# Altium PCB Layout.PcbDoc
Units mm, origin at the board's own origin, x right, y up, seen from the top; angles counter-clockwise.
Board outline 42 x 50 mm, 4 copper layers (Top Layer, Ground Layer, Power Layer, Bottom Layer), stack 1.591 mm thick; 42 components, 51 nets, 169 pads, 78 vias.
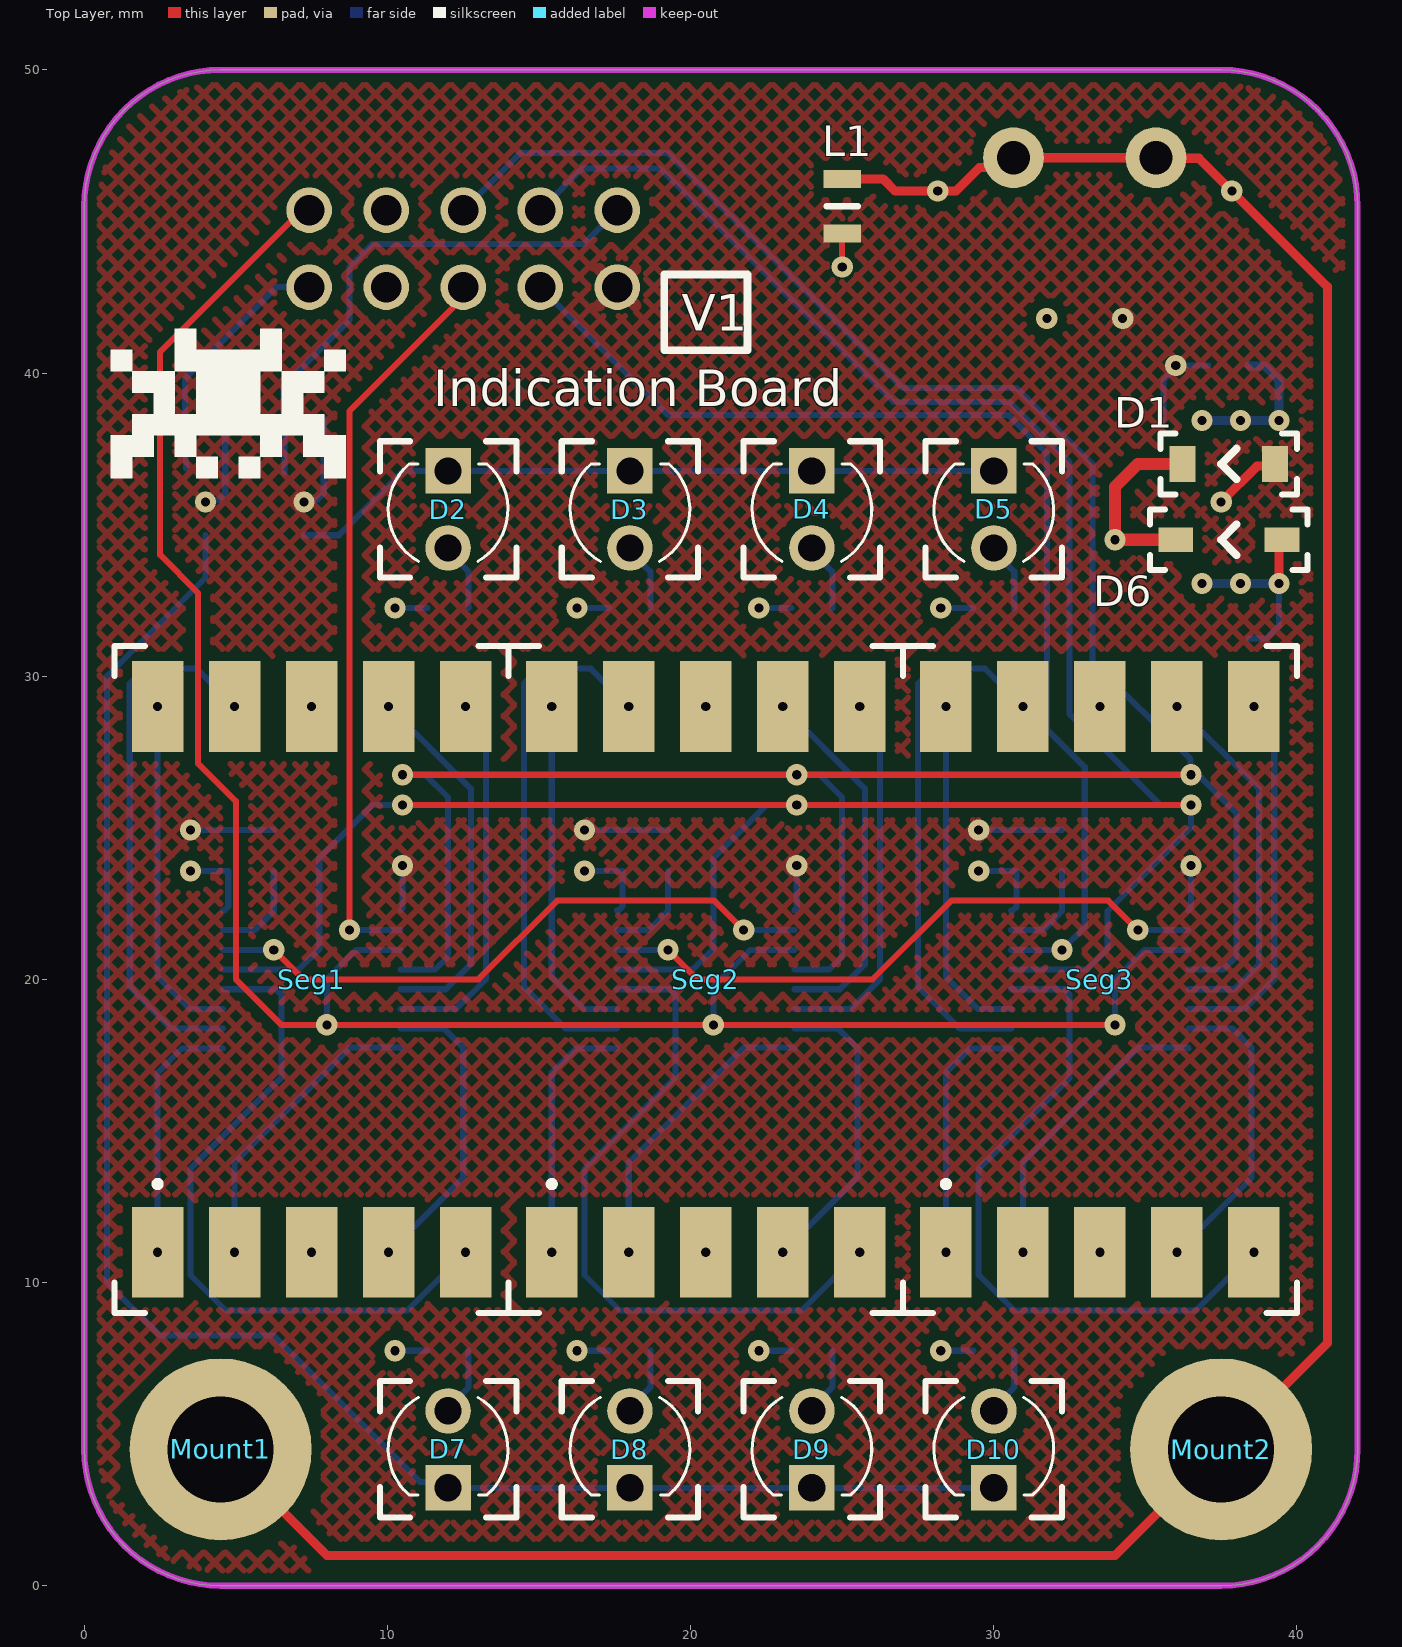
[diagram p0: Top Layer view]
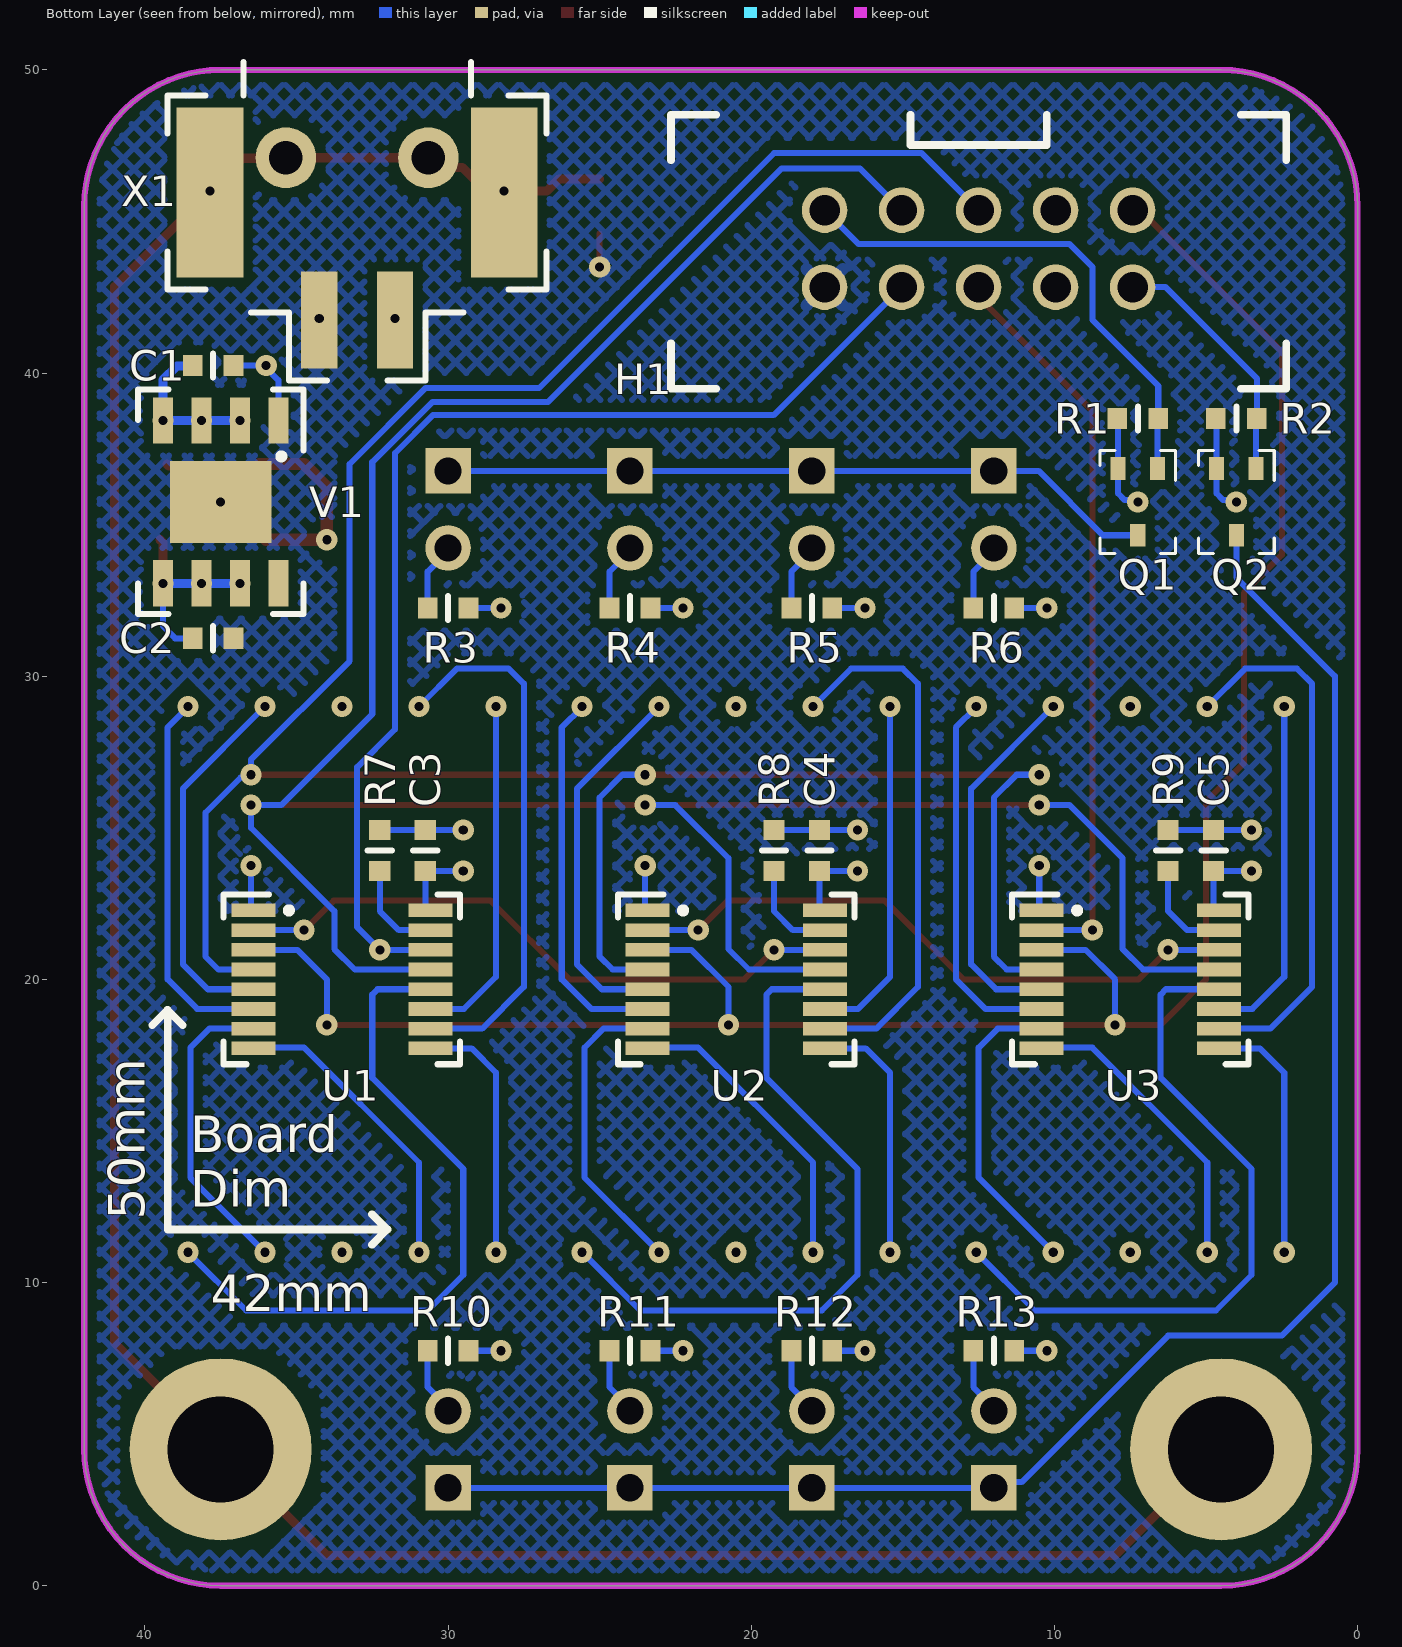
[diagram p1: Bottom Layer view, seen from below]
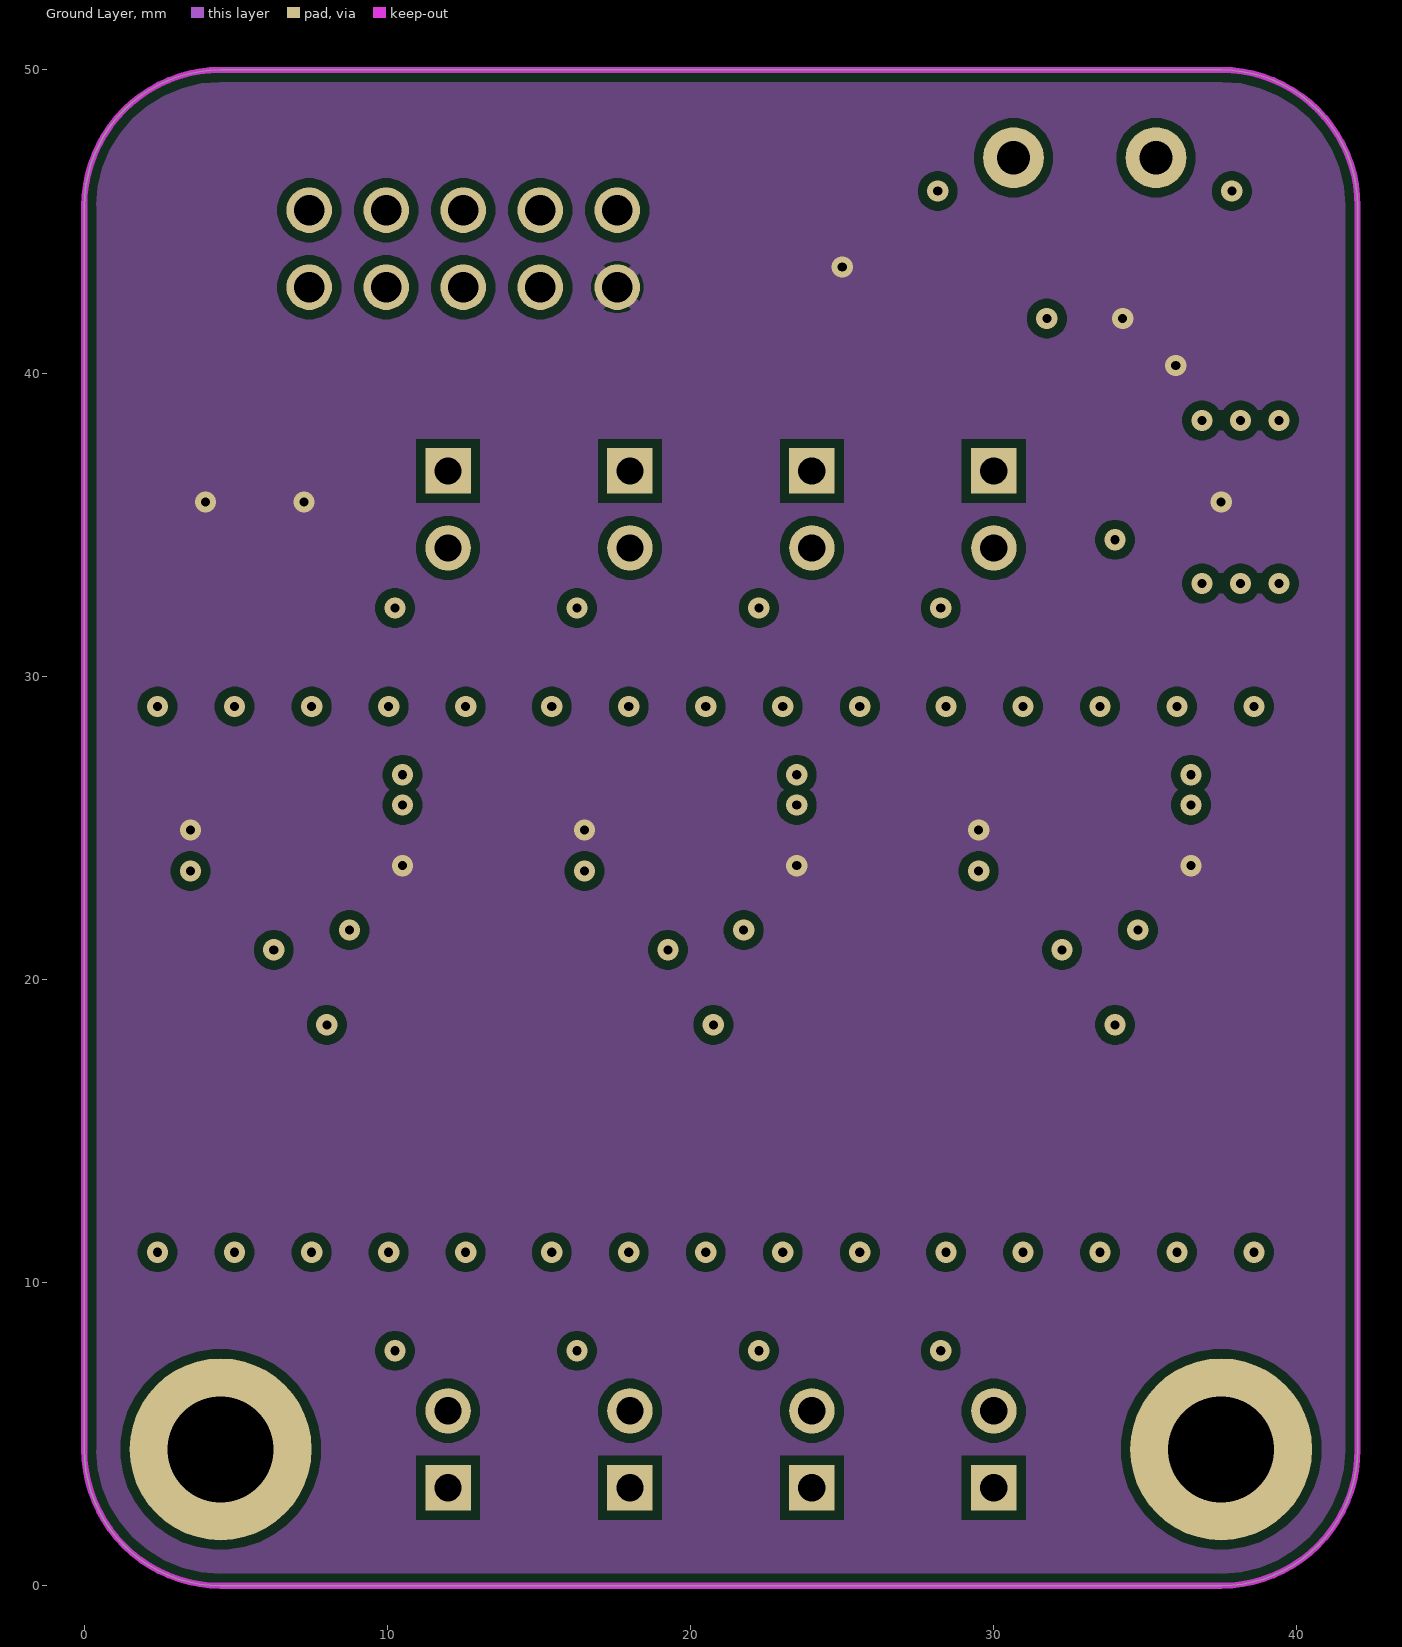
[diagram p2: Ground Layer]
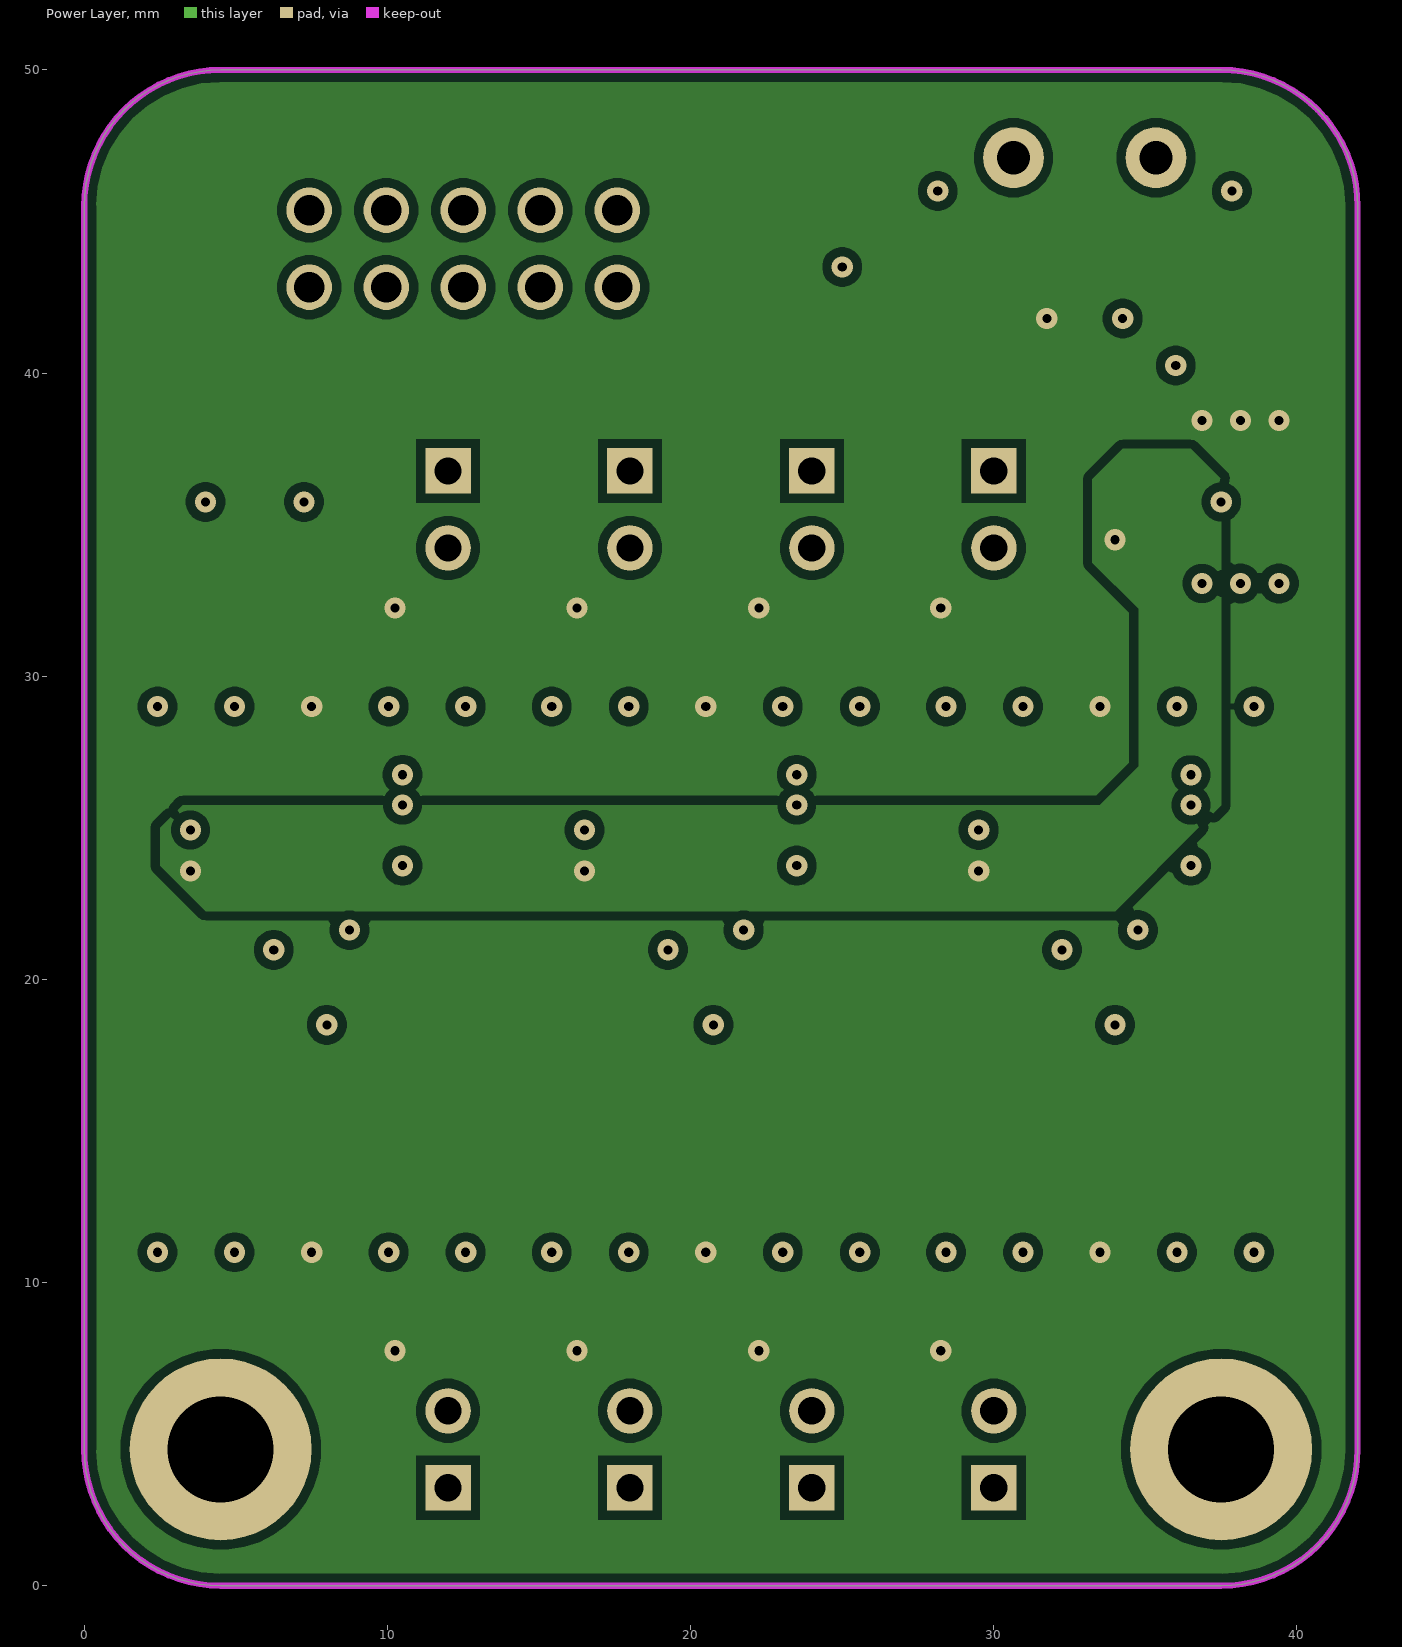
[diagram p3: Power Layer]
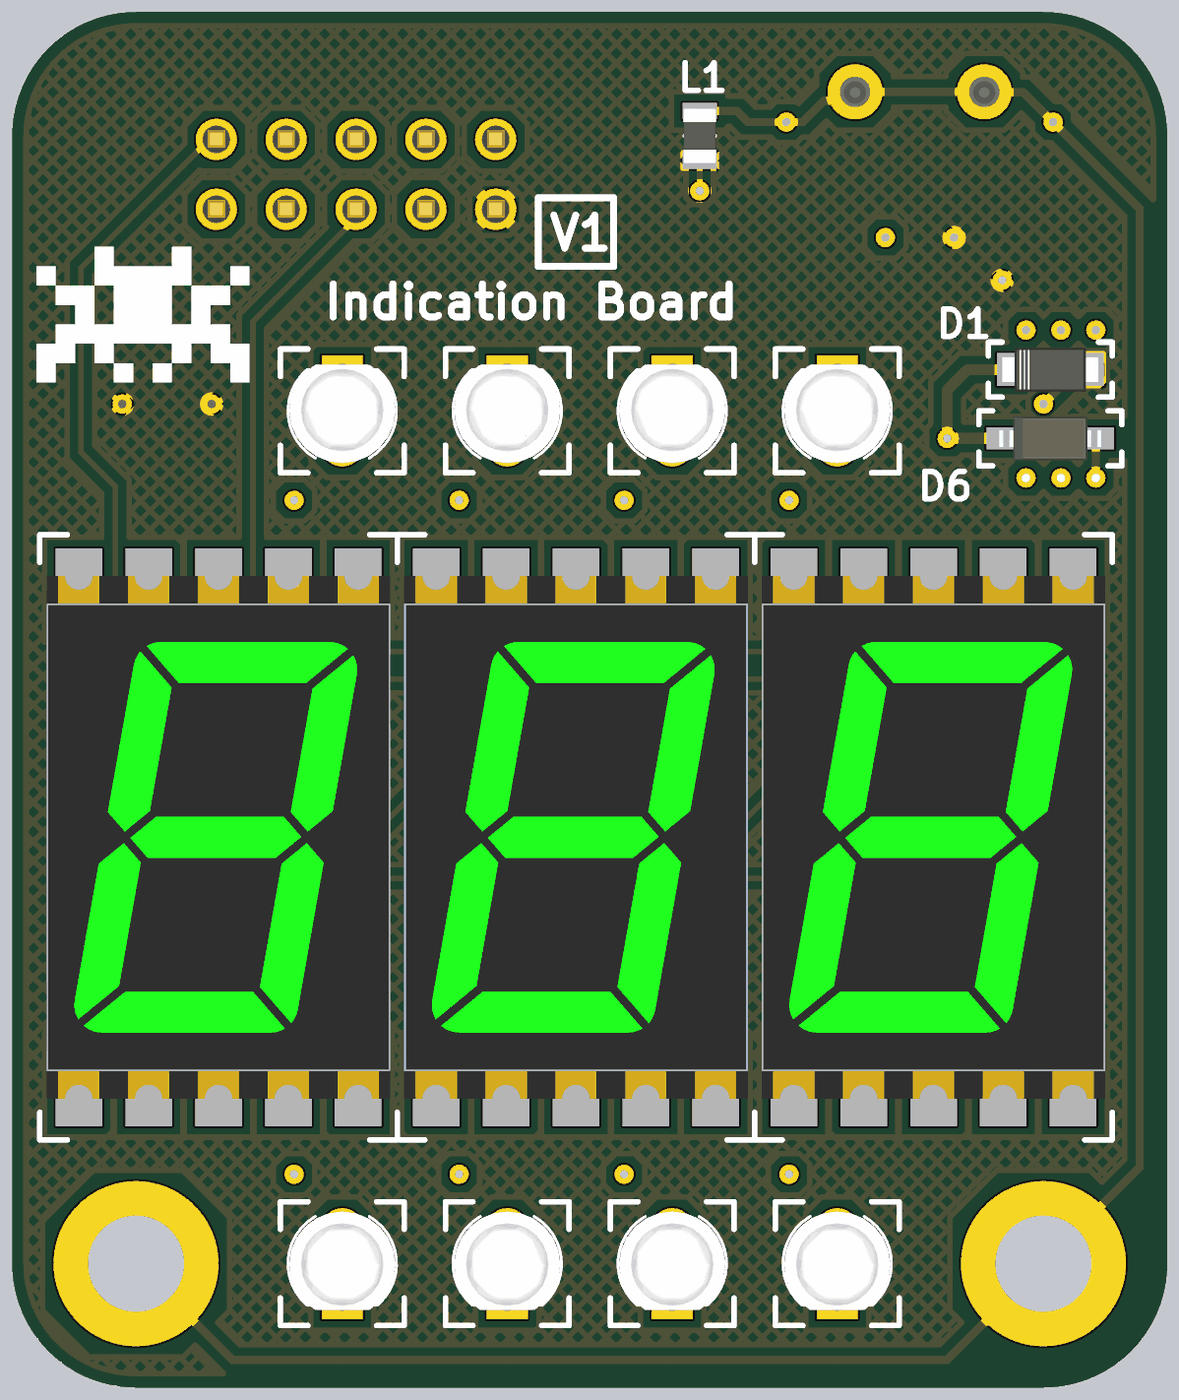
[diagram p4: 3D render of the assembled board from above, using the file's embedded part models]
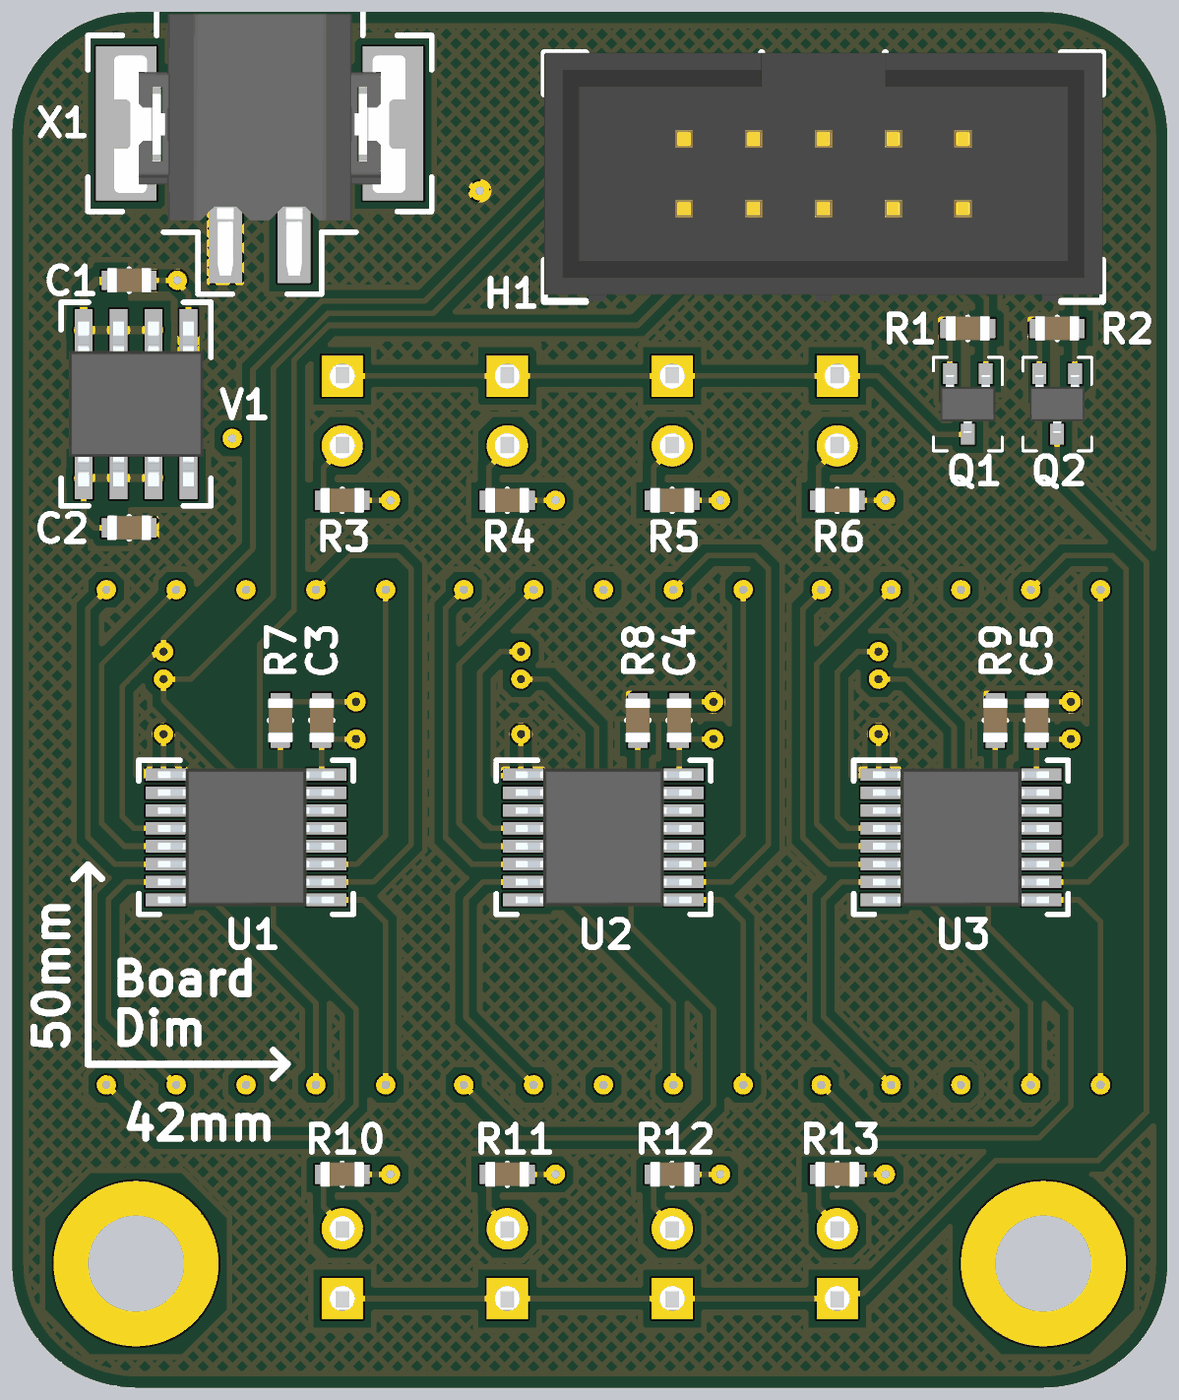
[diagram p5: 3D render of the assembled board from below, using the file's embedded part models]

## Layer stack, top to bottom
Top Solder: solder mask 0.0102, Solder Resist, Dk 3.8
Top Layer: signal copper 0.035
Dielectric 2: prepreg 0.2104, 7628*1, Dk 4.4
Ground Layer: signal copper 0.0175
Dielectric 1: dielectric 1.065, FR-4, Dk 4.8
Power Layer: signal copper 0.0175
Dielectric 3: prepreg 0.2104, 7628*1, Dk 4.4
Bottom Layer: signal copper 0.035
Bottom Solder: solder mask 0.0102, Solder Resist, Dk 3.8

## Board outline
4.5,0 cw(c4.5,4.5) 0,4.5 0,45.5 cw(c4.5,45.5) 4.5,50 37.5,50 cw(c37.5,45.5) 42,45.5 42,4.5 cw(c37.5,4.5) 37.5,0

## Design rules (kind name [scope] priority, off if disabled: settings)
BoardOutlineClearance [All] p1: gap=0.2 ignorepadtopadclearanceinfootprint=FALSE
Clearance "inPolygon Clearance" [InPolygon] p1: gap=0.3 ignorepadtopadclearanceinfootprint=TRUE // this rule ensures that every net within a polygon of a different net has a set clearance from the poly
Clearance "High Current Polygon Clearance" [(InPolygon AND InNetClass('High_Current_Nets'))] p2: gap=0 ignorepadtopadclearanceinfootprint=TRUE // this rule ensures that every net within a polygon of a different net has a set clearance from the poly
Clearance "Different Diff Pair" [All] p3: gap=0.2 ignorepadtopadclearanceinfootprint=TRUE
Clearance "Same Diff Pair" [All] p4: gap=0.1 ignorepadtopadclearanceinfootprint=TRUE
Clearance "Different Nets" [not InAnyDifferentialPair] p5: gap=0.3 ignorepadtopadclearanceinfootprint=TRUE except(0.1: Arc-SMDPad Arc-THPad Arc-Via Arc-Text Track-SMDPad Track-THPad Track-Via Track-Text SMDPad-Text THPad-Text Via-Text Fill-Text Poly-Text Region-Text Text-Text; 0.12: Arc-Arc Arc-Track Track-Track; 0.15: SMDPad-SMDPad SMDPad-THPad SMDPad-Via THPad-THPad THPad-Via Via-Via; 0.2: Arc-Hole Track-Hole SMDPad-Hole THPad-Hole Via-Hole Fill-Hole Poly-Hole Region-Hole Text-Hole)
Clearance "Same Net" [not InAnyDifferentialPair] p6: gap=0 ignorepadtopadclearanceinfootprint=TRUE except(0.1: THPad-Via; 0.18: Arc-Arc Arc-Track Track-Track)
ComponentClearance [All] p1: gap=0.102 collisioncheckmode=3 verticalgap=0.102 showdistances=TRUE
DiffPairsRouting "Ethernet Routing" [InDifferentialPairClass('Ethernet_Pairs')] p1: maxlimit=0.25 minlimit=0.2 mostfreqgap=0.25 toplayer_maxgap=0.2 toplayer_prefgap=0.2 toplayer_minwidth=0.25 toplayer_maxwidth=0.25 toplayer_prefwidth=0.25 midlayer1_mingap=0.25 midlayer1_minwidth=0.19 midlayer1_maxwidth=0.19 midlayer1_prefwidth=0.19 midlayer2_mingap=0.25 midlayer2_minwidth=0.19 midlayer2_maxwidth=0.19 midlayer2_prefwidth=0.19 bottomlayer_maxgap=0.2 bottomlayer_prefgap=0.2 bottomlayer_minwidth=0.25 bottomlayer_maxwidth=0.25 bottomlayer_prefwidth=0.25 impedanceprofiledriven=TRUE maxuncoupledlength=12.7
DiffPairsRouting "USB Routing" [InDifferentialPairClass('USB_Pairs')] p2: maxlimit=0.291 minlimit=0.127 mostfreqgap=0.291 toplayer_maxgap=0.127 toplayer_prefgap=0.127 toplayer_minwidth=0.23 toplayer_maxwidth=0.23 toplayer_prefwidth=0.23 midlayer1_mingap=0.291 midlayer1_minwidth=0.25 midlayer1_maxwidth=0.25 midlayer1_prefwidth=0.25 midlayer2_mingap=0.291 midlayer2_minwidth=0.25 midlayer2_maxwidth=0.25 midlayer2_prefwidth=0.25 bottomlayer_maxgap=0.127 bottomlayer_prefgap=0.127 bottomlayer_minwidth=0.23 bottomlayer_maxwidth=0.23 bottomlayer_prefwidth=0.23 maxuncoupledlength=12.7
DiffPairsRouting "CAN Routing" [InDifferentialPairClass('CAN_Pairs')] p3: maxlimit=0.907 minlimit=0.5 mostfreqgap=0.907 toplayer_maxgap=0.5 toplayer_prefgap=0.5 toplayer_minwidth=0.201 toplayer_maxwidth=0.201 toplayer_prefwidth=0.201 midlayer1_mingap=0.907 midlayer1_minwidth=0.155 midlayer1_maxwidth=0.155 midlayer1_prefwidth=0.155 midlayer2_mingap=0.907 midlayer2_minwidth=0.155 midlayer2_maxwidth=0.155 midlayer2_prefwidth=0.155 bottomlayer_maxgap=0.5 bottomlayer_prefgap=0.5 bottomlayer_minwidth=0.201 bottomlayer_maxwidth=0.201 bottomlayer_prefwidth=0.201 maxuncoupledlength=12.7
DiffPairsRouting "RS485 Routing" [InDifferentialPairClass('RS485_Pairs')] p4: maxlimit=1.376 minlimit=0.127 mostfreqgap=1.376 toplayer_maxgap=0.127 toplayer_prefgap=0.127 toplayer_minwidth=0.1 toplayer_maxwidth=0.1 toplayer_prefwidth=0.1 midlayer1_mingap=1.376 midlayer1_minwidth=0.1 midlayer1_maxwidth=0.1 midlayer1_prefwidth=0.1 midlayer2_mingap=1.376 midlayer2_minwidth=0.1 midlayer2_maxwidth=0.1 midlayer2_prefwidth=0.1 bottomlayer_maxgap=0.127 bottomlayer_prefgap=0.127 bottomlayer_minwidth=0.1 bottomlayer_maxwidth=0.1 bottomlayer_prefwidth=0.1 impedanceprofiledriven=TRUE maxuncoupledlength=12.7
Height [All] p1: minheight=0 maxheight=1816.048 prefheight=12.7
HoleSize [All] p1: absolutevalues=TRUE maxlimit=6.3 minlimit=0.3 maxpercent=80.000 minpercent=20.000
HoleToHoleClearance [All] p1: gap=0.25 allowstackedmicrovias=FALSE
MatchedLengths "XTAL Nets Matched Delays" [InNetClass('XTAL_Nets')] p1: tolerance=25.4 checknetsindiffpair=FALSE checkdiffpairvsdiffpair=TRUE checkxsignals=TRUE checkothers=TRUE usedelayunits=TRUE delaytolerance=10.000000
MatchedLengths "Diff Pair Matched Delays" [InDifferentialPairClass('Ethernet_Pairs') or InDifferentialPairClass('USB_Pairs') or InDifferentialPairClass('CAN_Pairs')] p2: tolerance=5 checknetsindiffpair=TRUE checkdiffpairvsdiffpair=FALSE checkxsignals=FALSE checkothers=FALSE usedelayunits=TRUE delaytolerance=100.000000 phasematching=TRUE phasedelaytolerance=5.000000 phasedistance=12.7
MinimumAnnularRing [All] p1: minimumring=0.2
MinimumSolderMaskSliver [All] p1: minsoldermaskwidth=0
PlaneClearance "Supply Net Clearance" [InNetClass('Supply_Nets')] p1: clearance=0.5
PlaneClearance "All Nets" [All] p2: clearance=0.3
PolygonConnect "High Current" [InNetClass('High_Current_Nets')] p1: thpad.connectstyle=Relief thpad.reliefconductorwidth=0.4 thpad.reliefentries=4 thpad.polygonreliefangle="90 Angle" thpad.airgapwidth=0.1 thpad.conductorbypadedge=TRUE thpad.mindistance=0.381 thpad.enablemindistance=FALSE smdpad.connectstyle=Direct smdpad.reliefconductorwidth=0.254 smdpad.reliefentries=4 smdpad.polygonreliefangle="90 Angle" smdpad.airgapwidth=0.254 via.connectstyle=Direct via.reliefconductorwidth=0.254 via.reliefentries=4 via.polygonreliefangle="90 Angle" via.airgapwidth=0.254
PolygonConnect "Supply Nets" [InNetClass('Supply_Nets') OR InNetClass('Supply_Net')] p2: connectstyle=Relief reliefconductorwidth=0.3 reliefentries=4 polygonreliefangle="90 Angle" conductorbypadedge=TRUE mindistance=0.381 enablemindistance=FALSE airgapwidth=0.254
PolygonConnect General [All] p3: connectstyle=Relief reliefconductorwidth=0.254 reliefentries=4 polygonreliefangle="90 Angle" airgapwidth=0.254
RoutingVias [All] p1: holewidth=0.2 width=0.35 viastyle="Through Hole" minholewidth=0.15 minwidth=0.3 maxholewidth=6.3 maxwidth=6.55
SilkToSilkClearance [All] p1: silktosilkclearance=0
SilkToSolderMaskClearance [All] p1: minsilkscreentomaskgap=0 clearancetoexposedcopper=TRUE
SolderMaskExpansion [All] p1: expansion=0.075 istentingtop=FALSE
SupplyNets "Schematic Supply Nets_4" [InNet('Earth')] p1: voltage=0.000
SupplyNets "Schematic Supply Nets_6" [InNet('+3V3')] p2: voltage=0.000
SupplyNets "Schematic Supply Nets" [InNet('+5V')] p3: voltage=0.000
SupplyNets "Schematic Supply Nets_3" [InNet('GND')] p4: voltage=0.000
UnRoutedNet [All] p1: checkbadconnections=TRUE
Width "nRF Width" [InNetClass('nRF Signal')] p1: maxlimit=0.379 minlimit=0.263 preferedwidth=0.379 toplayer_minwidth=0.379 midlayer1_maxwidth=0.263 midlayer1_prefwidth=0.263 midlayer2_maxwidth=0.263 midlayer2_prefwidth=0.263 bottomlayer_minwidth=0.379 minimp=50.000000 maximp=50.000000 favimp=50.000000 checkconnectedcopper=TRUE
Width [All] p2: maxlimit=100 minlimit=0.1 preferedwidth=0.2
20 further rules are at their usual default settings.

## Classes and differential pairs
net class High_Current_Nets: +3V3 +5V GND NetC2_2
component class Power: C1 C2 D1 D6 V1
component class LEDs: C3 C4 C5 D2 D3 D4 D5 D7 D8 D9 D10 Q1 Q2 R1 R2 R3 R4 R5 R6 R7 R8 R9 R10 R11 R12 R13 Seg1 Seg2 Seg3 U1 U2 U3
component class Connectors: H1 L1 Mount1 Mount2 X1

## Components (designator, comment, footprint, x,y, rotation, side; value= is the part's Value field where it differs from the comment)
C1 "[Cap] 0603 10uF 20% 16V" "[Cap] SMD 0603" 37.75,40.25 r0 bottom
C2 "[Cap] 0603 10uF 20% 16V" "[Cap] SMD 0603" 37.75,31.25 r0 bottom
C3 "[Cap] 0603 0.1uF 10% 50V" "[Cap] SMD 0603" 30.75,24.25 r270 bottom (schematic designator C5)
C4 "[Cap] 0603 0.1uF 10% 50V" "[Cap] SMD 0603" 17.75,24.25 r270 bottom
C5 "[Cap] 0603 0.1uF 10% 50V" "[Cap] SMD 0603" 4.75,24.25 r270 bottom (schematic designator C3)
D1 "SOD-123F" "[Diode] SOD-123F" 37.75,37 r180 top (schematic designator D2)
D2 "[LED] Thru-Hole 3mm White" "[LED] Thru-Hole 3mm White" 12,35.5 r90 top (schematic designator D7)
D3 "[LED] Thru-Hole 3mm White" "[LED] Thru-Hole 3mm White" 18,35.5 r90 top (schematic designator D8)
D4 "[LED] Thru-Hole 3mm White" "[LED] Thru-Hole 3mm White" 24,35.5 r90 top (schematic designator D9)
D5 "[LED] Thru-Hole 3mm White" "[LED] Thru-Hole 3mm White" 30,35.5 r90 top (schematic designator D10)
D6 "SOD123" "[Diode] SMD SOD-123" 37.75,34.5 r180 top (schematic designator D1)
D7 "[LED] Thru-Hole 3mm White" "[LED] Thru-Hole 3mm White" 12,4.5 r270 top (schematic designator D3)
D8 "[LED] Thru-Hole 3mm White" "[LED] Thru-Hole 3mm White" 18,4.5 r270 top (schematic designator D4)
D9 "[LED] Thru-Hole 3mm White" "[LED] Thru-Hole 3mm White" 24,4.5 r270 top (schematic designator D5)
D10 "[LED] Thru-Hole 3mm White" "[LED] Thru-Hole 3mm White" 30,4.5 r270 top (schematic designator D6)
H1 "2x5 Shrouded" "[Rectangular] Shrouded 2x5 Male" 12.5,44 r0 bottom
L1 "652-MH2029-300Y" "[Ferrite] SMD 0805" 25,45.5 r270 top
Mount1 "M3 Mount Hole" "[Mount] M3 Mount Hole" 4.5,4.5 r0 top
Mount2 "M3 Mount Hole" "[Mount] M3 Mount Hole" 37.5,4.5 r0 top
Q1 "[NMOS] SMD 20V 1.4A 160mOhm" SOT323 7.25,35.75 r270 bottom
Q2 "[NMOS] SMD 20V 1.4A 160mOhm" SOT323 4,35.75 r270 bottom
R1 "[1k] SMD 0603 1% 1/10W" "[Res] SMD 0603" 7.25,38.5 r180 bottom (schematic designator R12)
R2 "[1k] SMD 0603 1% 1/10W" "[Res] SMD 0603" 4,38.5 r180 bottom (schematic designator R13)
R3 "[220] SMD 0603 5% 1/10W" "[Res] SMD 0603" 30,32.25 r180 bottom (schematic designator R11)
R4 "[220] SMD 0603 5% 1/10W" "[Res] SMD 0603" 24,32.25 r180 bottom (schematic designator R10)
R5 "[220] SMD 0603 5% 1/10W" "[Res] SMD 0603" 18,32.25 r180 bottom (schematic designator R9)
R6 "[220] SMD 0603 5% 1/10W" "[Res] SMD 0603" 12,32.25 r180 bottom (schematic designator R8)
R7 "[1k] SMD 0603 1% 1/10W" "[Res] SMD 0603" 32.25,24.25 r90 bottom (schematic designator R3)
R8 "[1k] SMD 0603 1% 1/10W" "[Res] SMD 0603" 19.25,24.25 r90 bottom (schematic designator R2)
R9 "[1k] SMD 0603 1% 1/10W" "[Res] SMD 0603" 6.25,24.25 r90 bottom (schematic designator R1)
R10 "[220] SMD 0603 5% 1/10W" "[Res] SMD 0603" 30,7.75 r180 bottom (schematic designator R7)
R11 "[220] SMD 0603 5% 1/10W" "[Res] SMD 0603" 24,7.75 r180 bottom (schematic designator R6)
R12 "[220] SMD 0603 5% 1/10W" "[Res] SMD 0603" 18,7.75 r180 bottom (schematic designator R5)
R13 "[220] SMD 0603 5% 1/10W" "[Res] SMD 0603" 12,7.75 r180 bottom (schematic designator R4)
Seg1 "DSM7TA56105T" "[Segment Display] Single 7-Seg Common Anode SMD" 7.5,20 r0 top
Seg2 "DSM7TA56105T" "[Segment Display] Single 7-Seg Common Anode SMD" 20.5,20 r0 top
Seg3 "DSM7TA56105T" "[Segment Display] Single 7-Seg Common Anode SMD" 33.5,20 r0 top
U1 "[Shift Register] Common Anode LED Dimmable" 16-TSSOP 33.5,20 r180 bottom (schematic designator U3)
U2 "[Shift Register] Common Anode LED Dimmable" 16-TSSOP 20.5,20 r180 bottom
U3 "[Shift Register] Common Anode LED Dimmable" 16-TSSOP 7.5,20 r180 bottom (schematic designator U1)
V1 "3V3 1.5A" "[Linear] 3V3 1.5A" 37.5,35.75 r270 bottom
X1 "[Pheonix] 2pin 2.5mm pitch" "[Pheonix] 2pin 2.5mm pitch" 33,41.75 r0 bottom

## Footprints (in the part's own frame and the unit in brackets; to place one, negate y for a bottom-side part, rotate by r counter-clockwise, add the part's x,y. Pads: shape width x height; smd on the part's side, far side on the other; paste and mask are expansions set on the pad)
16-TSSOP [mm]
  rect 1.45x0.45 smd: 1(-2.925,2.275) 2(-2.925,1.625) 3(-2.925,0.975) 4(-2.925,0.325) 5(-2.925,-0.325) 6(-2.925,-0.975) 7(-2.925,-1.625) 8(-2.925,-2.275) 9(2.925,-2.275) 10(2.925,-1.625) 11(2.925,-0.975) 12(2.925,-0.325) 13(2.925,0.325) 14(2.925,0.975) 15(2.925,1.625) 16(2.925,2.275)
  silkscreen extent -3.9,-2.8 3.9,2.8, body extent -3.2,-2.5 3.2,2.5, height 1.2
"[Cap] SMD 0603" [mm]
  rect 0.65x0.7 smd: 1(-0.675,0) 2(0.675,0)
  silkscreen extent 0,-0.4 0,0.4, body extent -0.8,-0.45 0.8,0.45, height 0.8
"[Diode] SMD SOD-123" [mm]
  rect 1.15x0.8 smd: 1(1.75,0) 2(-1.75,0)
  silkscreen extent -2.6,-1 2.6,1, body extent -1.85,-0.8 1.86,0.8, height 1.35
"[Diode] SOD-123F" [mm]
  rect 0.85x1.2 smd: 1(1.525,0) 2(-1.525,0)
  silkscreen extent -2.25,-1 2.25,1, body extent -1.75,-0.8 1.75,0.8, height 0.8
"[Ferrite] SMD 0805" [mm]
  rect 0.6x1.25 smd: 1(-0.9,0) 2(0.9,0)
  silkscreen extent 0,-0.53 0,0.53, body extent -1,-0.6 1,0.6, height 1.1
"[LED] Thru-Hole 3mm White" [mm]
  round 1.5 hole 0.9: 1(-1.27,0)
  rect 1.5x1.5 hole 0.9: 2(1.27,0)
  silkscreen extent -2.25,-2.25 2.25,2.25, body extent -1.88,-1.92 1.68,1.92, height 5.6
"[Linear] 3V3 1.5A" [mm]
  rect 1.525x0.65 smd: 1(-2.688,1.905) 2(-2.688,0.635) 3(-2.688,-0.635) 4(-2.688,-1.905) 5(2.688,-1.905) 6(2.688,-0.635) 7(2.688,0.635) 8(2.688,1.905)
  rect 2.71x3.35 smd: 9(0,0)
  silkscreen extent -3.7,-2.73 3.7,2.73, body extent -3,-2.45 3,2.45, height 1.5
"[Mount] M3 Mount Hole" [mm]
  round 6 hole 3.5: 1(0,0)
"[Pheonix] 2pin 2.5mm pitch" [mm] "1778764"
  rect 1.2x3.2 smd: 1(-1.25,0) 2(1.25,0)
  rect 2.2x5.6 smd: MP(-4.85,-4.2) MP(4.85,-4.2)
  round 2 hole 1.1: MP(-2.35,-5.35) MP(2.35,-5.35)
  silkscreen extent -6.25,-8.5 6.25,2, body extent -5.3,-8.18 5.3,1.32, height 5
"[Rectangular] Shrouded 2x5 Male" [mm]
  round 1.5 hole 1: 1(-5.08,-1.37) 2(-5.08,1.17) 3(-2.54,-1.37) 4(-2.54,1.17) 5(0,-1.37) 6(0,1.17) 7(2.54,-1.37) 8(2.54,1.17) 9(5.08,-1.37) 10(5.08,1.17)
  silkscreen extent -10.15,-4.52 10.15,4.52, body extent -10.15,-4.52 10.15,4.52, height 8.8
"[Res] SMD 0603" [mm]
  rect 0.65x0.7 smd: 1(-0.675,0) 2(0.675,0)
  silkscreen extent 0,-0.4 0,0.4, body extent -0.8,-0.45 0.8,0.45, height 0.8
"[Segment Display] Single 7-Seg Common Anode SMD" [mm] "DSM7TA56105T"
  rect 1.7x3 smd: 1(-5.08,-9) 2(-2.54,-9) 3(0,-9) 4(2.54,-9) 5(5.08,-9) 6(5.08,9) 7(2.54,9) 8(0,9) 9(-2.54,9) 10(-5.08,9)
  silkscreen extent -6.5,-11 6.5,11, body extent -6.25,-9.5 6.25,9.5, height 4
SOT323 [mm]
  rect 0.75x0.5 smd: 1(-1.1,0.65) 2(-1.1,-0.65) 3(1.1,0)
  silkscreen extent -1.7,-1.25 1.7,1.25, body extent -1.05,-1 1.05,1, height 1

## Part data
C1 C2: "GRM188C81C106MA73D", Capacitance=10uF, Max Voltage=16V, Size Package=0603, Supplier Part Number 1=490-7198-1-ND, Tolerance=20%, Supplier 1=DigiKey
C3 C4 C5: "CL10B104KB8NNNC", Capacitance=100nF, Max Voltage=50V, Size Package=0603, Supplier Part Number 1=1276-1000-6-ND, Tolerance=10%, Supplier 1=DigiKey
D1: library part "[Zener] SMD 3.5V 1W 6%", "KDZVTR3.3B", Optimal Zener Voltage=3.5V, Supplier Part Number 1=846-KDZVTR3.3BCT-ND, Tolerance=6.06%, Supplier 1=DigiKey, Wattage=1W
D2 D3 D4 D5 D7 D8 D9 D10: "QBL7IW60D-WW", Color=White, Supplier Part Number 1=1516-QBL7IW60D-WW-ND, Lens Diameter=3mm, Supplier 1=DigiKey
D6: library part "[Schottky] SMD 40V 1A", "B5819W-TP", Supplier Part Number 1=B5819W-TPMSCT-ND, Supplier 1=DigiKey
H1: library part "[Rectangular] Shrouded 2x5 Male", "BHR-10-VUA", Supplier Part Number 1=2057-BHR-10-VUA-ND, Supplier 1=DigiKey, System=Connector
L1: library part "[Ferrite] SMD 0805 3A 30ohm", Res @ Freq="30 @ 100MHz", Size Package=0805, Supplier Part Number 1=MH2029-300YCT-ND, Supplier 1=DigiKey
Mount1 Mount2: library part "[Mount] M3 Mount Hole", "Place at least 4.5mm from board edge. Plated."
Q1 Q2: "BSS816NWH6327XTSA1", Supplier Part Number 1=BSS816NWH6327XTSA1CT-ND, Supplier 1=DigiKey
R1 R2 R7 R8 R9: "RMCF0603FT1K00", Resistance=1k, Size Package=0603, Supplier Part Number 1=RMCF0603FT1K00DKR-ND, Tolerance=1%, Supplier 1=DigiKey, Wattage=1/10W
R3 R4 R5 R6 R10 R11 R12 R13: "RK73B1JTTD221J", Resistance=220, Size Package=0603, Supplier Part Number 1=2019-RK73B1JTTD221JDKR-ND, Tolerance=5%, Supplier 1=DigiKey, Wattage=1/8W
Seg1 Seg2 Seg3: library part "[Segment Display] Single 7-Seg Common Anode SMD", Supplier Part Number 1=DSM7TA56105TCT-ND, Supplier 1=DigiKey
U1 U2 U3: "TLC5916IPW", Supplier Part Number 1=296-34370-5-ND, Supplier 1=DigiKey
V1: library part "[Linear] SMD 3V3 1.5A", "AP7362A-33SP-13", Supplier Part Number 1=AP7362A-33SP-13DICT-ND, Supplier 1=DigiKey
X1: "1778764", Supplier Part Number 1=277-2315-1-ND, Supplier 1=DigiKey, System=Connector

## Via types
v1: diameter 0.7, hole 0.3, Top Layer to Bottom Layer, 78 vias

## Nets (pads, with @x,y where several pads share a name; then routed paths per layer and width w, separated by ;. In a path a pad name is that pad's centre, name@x,y a point inside that pad or via, vN(x,y) a via of type N, cw(c..) or ccw(c..) an arc to the next point about the centre after c; other vN are vias at no path point)
+3V3: C3.2 C4.2 C5.2 D1.1 D6.1 U1.16 U2.16 U3.16 | length 14.2
  Top Layer w0.4: D6.1 v1(34,34.5) 34,36.25 34.75,37 D1.1
  Bottom Layer w0.2: v1(3.5,23.575) C5.2 4.75,22.4 4.625,22.275 U3.16 ; v1(16.5,23.575) C4.2 17.75,22.4 17.625,22.275 U2.16 ; v1(29.5,23.575) C3.2 30.75,22.4 30.625,22.275 U1.16
+5V: C1.2 R3.2 R4.2 R5.2 R6.2 R10.2 R11.2 R12.2 R13.2 Seg1.3 Seg1.8 Seg2.3 Seg2.8 Seg3.3 Seg3.8 V1.2 V1.3 V1.4 X1.1 | length 13.7
  Bottom Layer w0.2: v1(10.25,7.75) R13.2 ; v1(10.25,32.25) R6.2 ; v1(16.25,7.75) R12.2 ; v1(16.25,32.25) R5.2 ; v1(22.25,7.75) R11.2 ; v1(22.25,32.25) R4.2 ; v1(28.25,7.75) R10.2 ; v1(28.25,32.25) R3.2
  Bottom Layer w0.3: v1(36.865,38.438) v1(38.135,38.438) v1(39.405,38.438) 39.405,39.77 38.939,40.236 38.439,40.236 C1.2
  other v1: 7.5,11 20.5,11 33.5,11 7.5,29 20.5,29 33.5,29 31.75,41.8
\Seg_OE: H1.7 U1.13 U2.13 U3.13 | length 90.8
  Top Layer w0.2: v1(10.5,25.75) v1(23.5,25.75) v1(36.5,25.75)
  Bottom Layer w0.2: U3.13 7.075,20.325 7.75,21 7.75,24 9.5,25.75 v1(10.5,25.75) ; H1.7 16.42,46.75 19,46.75 26.699,39.051 30.512,39.051 32.5,37.063 32.5,28.75 35.5,25.75 v1(36.5,25.75) 36.5,25 33.75,22.25 33.75,21 33.075,20.325 U1.13 ; U2.13 20.075,20.325 20.75,21 20.75,24 22.5,25.75 v1(23.5,25.75)
Earth: L1.1 Mount1.1 Mount2.1 X1.MP | length 94.1
  Top Layer w0.3: Mount1.1 8,1 34,1 Mount2.1 41,8 41,42.85 v1(37.85,46) 36.765,47.085 35.365,47.085 35.35,47.1 30.65,47.1 30.335,46.785 29.535,46.785 28.75,46 v1(28.15,46) 26.75,46 26.35,46.4 L1.1
External_LED_1: H1.9 Q1.1 R1.2 | length 17.3
  Bottom Layer w0.2: Q1.1@6.6,36.725 6.6,38.475 R1.2 6.575,39.575 8.75,41.75 8.75,43.5 9.5,44.25 16.46,44.25 H1.9
External_LED_2: H1.2 Q2.1 R2.2 | length 8.3
  Bottom Layer w0.2: R2.2 3.325,39.825 6.33,42.83 H1.2 ; Q2.1 R2.2@3.35,38.475
GND: C1.1 C2.1 C3.1 C4.1 C5.1 D1.2 H1.10 L1.2 Q1.2 Q2.2 R1.1 R2.1 R7.2 R8.2 R9.2 U1.1 U2.1 U3.1 V1.1 V1.9 X1.2 | length 25.7
  Top Layer w0.2: v1(25,43.5) L1.2
  Top Layer w0.3: v1(37.5,35.75) 38.681,36.931 39.206,36.931 D1.2
  Bottom Layer w0.2: v1(3.5,24.925) C5.1 R9.2 ; v1(4,35.75) 4.069,35.819 4.442,35.819 4.65,36.026 Q2.2 4.65,38.475 R2.1 ; v1(7.25,35.75) 7.319,35.819 7.692,35.819 7.9,36.026 7.9,38.475 R1.1 ; U3.1 10.5,22.35 v1(10.5,23.75) ; v1(16.5,24.925) C4.1 R8.2 ; U2.1 23.5,22.35 v1(23.5,23.75) ; v1(29.5,24.925) C3.1 R7.2 ; V1.1 35.595,39.764 36,40.169 v1(36,40.25) C1.1 ; U1.1 36.5,22.35 v1(36.5,23.75)
  other v1: 34.25,41.8
NetC2_2: C2.2 D6.2 V1.5 V1.6 V1.7 | length 6.6
  Top Layer w0.3: v1(39.405,33.062) 39.405,34.405 D6.2
  Bottom Layer w0.2: C2.2 39,31.25 39.405,31.655 v1(39.405,33.062)
  Bottom Layer w0.3: v1(36.865,33.062) v1(38.135,33.062) v1(39.405,33.062)
NetD2_1: D2.1 R6.1 | length 2.3
  Bottom Layer w0.2: D2.1 12,34.123 12.675,33.448 R6.1
NetD2_2: D2.2 D3.2 D4.2 D5.2 Q1.3 | length 23.6
  Bottom Layer w0.2: Q1.3 8.4,34.65 10.52,36.77 D2.2 D3.2 D4.2 D5.2
NetD3_1: D3.1 R5.1 | length 2.3
  Bottom Layer w0.2: D3.1 18,34.123 18.675,33.448 R5.1
NetD4_1: D4.1 R4.1 | length 2.3
  Bottom Layer w0.2: D4.1 24,34.123 24.675,33.448 R4.1
NetD5_1: D5.1 R3.1 | length 2.3
  Bottom Layer w0.2: D5.1 30,34.123 30.675,33.448 R3.1
NetD7_1: D7.1 R13.1 | length 2.3
  Bottom Layer w0.2: D7.1 12,5.877 12.675,6.552 R13.1
NetD7_2: D7.2 D8.2 D9.2 D10.2 Q2.3 | length 58.1
  Bottom Layer w0.2: Q2.3 4,33.25 0.75,30 0.75,10 2.5,8.25 6.25,8.25 11.081,3.419 11.811,3.419 D7.2 D8.2 D9.2 D10.2
NetD8_1: D8.1 R12.1 | length 2.3
  Bottom Layer w0.2: D8.1 18,5.877 18.675,6.552 R12.1
NetD9_1: D9.1 R11.1 | length 2.3
  Bottom Layer w0.2: D9.1 24,5.877 24.675,6.552 R11.1
NetD10_1: D10.1 R10.1 | length 2.3
  Bottom Layer w0.2: D10.1 30,5.877 30.675,6.552 R10.1
NetR7_1: R7.1 U1.15 | length 3.3
  Bottom Layer w0.2: U1.15 31.625,21.625 32.25,22.25 R7.1
NetR8_1: R8.1 U2.15 | length 3.3
  Bottom Layer w0.2: U2.15 18.625,21.625 19.25,22.25 R8.1
NetR9_1: R9.1 U3.15 | length 3.3
  Bottom Layer w0.2: U3.15 5.625,21.625 6.25,22.25 R9.1
NetSeg1_1: Seg1.1 U3.9 | length 8.4
  Bottom Layer w0.2: v1(2.42,11) 2.42,16.92 3.225,17.725 U3.9
NetSeg1_2: Seg1.2 U3.8 | length 10
  Bottom Layer w0.2: v1(4.96,11) 4.96,13.96 8.75,17.75 10.4,17.75 U3.8
NetSeg1_4: Seg1.4 U3.7 | length 10.1
  Bottom Layer w0.2: v1(10.04,11) 12.5,13.46 12.5,17.75 11.875,18.375 U3.7
NetSeg1_5: Seg1.5 U3.12 | length 22.9
  Bottom Layer w0.2: U3.12 6.325,19.675 6.5,19.5 6.5,16.75 3.5,13.75 3.5,10.25 4.671,9.079 10.659,9.079 v1(12.58,11)
NetSeg1_6: Seg1.6 U3.6 | length 12.5
  Bottom Layer w0.2: U3.6 12.275,19.025 13.25,20 13.25,28.31 12.58,28.98 v1(12.58,29)
NetSeg1_7: Seg1.7 U3.5 | length 12.3
  Bottom Layer w0.2: v1(10.04,29) 12.75,26.29 12.75,20.5 11.925,19.675 U3.5
NetSeg1_9: Seg1.9 U3.10 | length 17.8
  Bottom Layer w0.2: U3.10 2.875,18.375 1.5,19.75 1.5,29.75 2,30.25 3.71,30.25 v1(4.96,29)
NetSeg1_10: Seg1.10 U3.11 | length 11.5
  Bottom Layer w0.2: v1(2.42,29) 2.42,20.08 3.475,19.025 U3.11
NetSeg2_1: Seg2.1 U2.9 | length 8.4
  Bottom Layer w0.2: v1(15.42,11) 15.42,16.92 16.225,17.725 U2.9
NetSeg2_2: Seg2.2 U2.8 | length 10
  Bottom Layer w0.2: v1(17.96,11) 17.96,13.96 21.75,17.75 23.4,17.75 U2.8
NetSeg2_4: Seg2.4 U2.7 | length 10.1
  Bottom Layer w0.2: v1(23.04,11) 25.5,13.46 25.5,17.75 24.875,18.375 U2.7
NetSeg2_5: Seg2.5 U2.12 | length 22.9
  Bottom Layer w0.2: U2.12 19.325,19.675 19.5,19.5 19.5,16.75 16.5,13.75 16.5,10.25 17.671,9.079 23.659,9.079 v1(25.58,11)
NetSeg2_6: Seg2.6 U2.6 | length 12.5
  Bottom Layer w0.2: U2.6 25.275,19.025 26.25,20 26.25,28.31 25.58,28.98 v1(25.58,29)
NetSeg2_7: Seg2.7 U2.5 | length 12.3
  Bottom Layer w0.2: v1(23.04,29) 25.75,26.29 25.75,20.5 24.925,19.675 U2.5
NetSeg2_9: Seg2.9 U2.10 | length 17.8
  Bottom Layer w0.2: U2.10 15.875,18.375 14.5,19.75 14.5,29.75 15,30.25 16.71,30.25 v1(17.96,29)
NetSeg2_10: Seg2.10 U2.11 | length 11.5
  Bottom Layer w0.2: v1(15.42,29) 15.42,20.08 16.475,19.025 U2.11
NetSeg3_1: Seg3.1 U1.9 | length 8.4
  Bottom Layer w0.2: v1(28.42,11) 28.42,16.92 29.225,17.725 U1.9
NetSeg3_2: Seg3.2 U1.8 | length 10
  Bottom Layer w0.2: v1(30.96,11) 30.96,13.96 34.75,17.75 36.4,17.75 U1.8
NetSeg3_4: Seg3.4 U1.7 | length 10.1
  Bottom Layer w0.2: v1(36.04,11) 38.5,13.46 38.5,17.75 37.875,18.375 U1.7
NetSeg3_5: Seg3.5 U1.12 | length 22.9
  Bottom Layer w0.2: U1.12 32.325,19.675 32.5,19.5 32.5,16.75 29.5,13.75 29.5,10.25 30.671,9.079 36.659,9.079 v1(38.58,11)
NetSeg3_6: Seg3.6 U1.6 | length 12.5
  Bottom Layer w0.2: U1.6 38.275,19.025 39.25,20 39.25,28.31 38.58,28.98 v1(38.58,29)
NetSeg3_7: Seg3.7 U1.5 | length 12.3
  Bottom Layer w0.2: v1(36.04,29) 38.75,26.29 38.75,20.5 37.925,19.675 U1.5
NetSeg3_9: Seg3.9 U1.10 | length 17.8
  Bottom Layer w0.2: U1.10 28.875,18.375 27.5,19.75 27.5,29.75 28,30.25 29.71,30.25 v1(30.96,29)
NetSeg3_10: Seg3.10 U1.11 | length 11.5
  Bottom Layer w0.2: v1(28.42,29) 28.42,20.08 29.475,19.025 U1.11
NetU1_2: U1.2 U2.14 | length 20.7
  Top Layer w0.2: v1(19.25,20.975) 20.225,20 26,20 28.6,22.6 33.775,22.6 v1(34.75,21.625)
  Bottom Layer w0.2: U2.14 v1(19.25,20.975) ; v1(34.75,21.625) U1.2
NetU2_2: U2.2 U3.14 | length 20.7
  Top Layer w0.2: v1(6.25,20.975) 7.225,20 13,20 15.6,22.6 20.775,22.6 v1(21.75,21.625)
  Bottom Layer w0.2: U3.14 v1(6.25,20.975) ; v1(21.75,21.625) U2.2
Seg_LE: H1.5 U1.4 U2.4 U3.4 | length 89.5
  Top Layer w0.2: v1(10.5,26.75) v1(23.5,26.75) v1(36.5,26.75)
  Bottom Layer w0.2: U3.4 11.575,20.325 12,20.75 12,26 11.25,26.75 v1(10.5,26.75) ; H1.5 14.38,47.25 19.25,47.25 27,39.5 30.75,39.5 33.25,37 33.25,30.5 36.495,27.255 36.495,26.755 36.596,26.654 36.846,26.654 38,25.5 38,20.75 37.575,20.325 U1.4 ; U2.4 24.575,20.325 25,20.75 25,26 24.25,26.75 v1(23.5,26.75)
SPI0_MISO: H1.8 U1.14 | length 37.9
  Bottom Layer w0.2: H1.8 19.26,38.61 30.5,38.61 31.75,37.36 31.75,28.25 33,27 33,21.725 v1(32.25,20.975) U1.14
SPI0_MOSI: H1.6 U3.2 | length 24.4
  Top Layer w0.2: v1(8.75,21.625) 8.75,38.75 12.5,42.5 H1.6
  Bottom Layer w0.2: v1(8.75,21.625) U3.2
SPI0_SCK: H1.1 U1.3 U2.3 U3.3 | length 71.4
  Top Layer w0.2: H1.1@7.42,45.62 2.5,40.7 2.5,34 3.75,32.75 3.75,27.125 5,25.875 5,20 6.5,18.5 v1(8,18.5) v1(20.75,18.5) v1(34,18.5)
  Bottom Layer w0.2: v1(8,18.5) 8,20 8.975,20.975 U3.3 ; v1(20.75,18.5) 20.75,19.75 21.975,20.975 U2.3 ; v1(34,18.5) 34,20 34.975,20.975 U1.3
pads on no net: H1.3 H1.4 V1.8

## Polygon pours and split planes (outlines as drawn)
+5V on Power Layer "+5V Power Poly" (solid, remove dead copper, pour order 1): 0,0 42,0 42,50 0,50
+3V3 on Power Layer "+3V3 Power Poly" (solid, remove dead copper, pour order 0): 33.25,36.5 34.25,37.5 36.5,37.5 37.5,36.5 37.5,25.75 34,22.25 4,22.25 2.5,23.75 2.5,25 3.25,25.75 33.5,25.75 34.775,27.025 34.775,32.225 33.25,33.75
GND on Ground Layer "GND Power Poly" (solid, remove dead copper, pour order 2): 0,0 42,0 42,50 0,50
GND on Top Layer "Top GND Poly" (hatched 45Degree grid 0.5 track 0.2, remove dead copper, pour order 3): 0,0 42,0 42,50 0,50
GND on Bottom Layer "Bottom GND Poly" (hatched 45Degree grid 0.5 track 0.2, remove dead copper, pour order 4): 0,0 42,0 42,50 0,50

## Keep-outs
Keep-Out Layer:
  the board outline again, w0.2

## Silkscreen, mask and mechanical layers (free items; w line width, h text height)
Top Overlay:
  region: 3.001,41.466 3.693,41.466 3.693,40.761 5.807,40.761 5.807,41.466 6.511,41.466 6.511,40.057 5.807,40.057 5.807,38.648 6.511,38.648 6.511,40.057 7.92,40.057 7.92,39.353 7.92,39.352 7.216,39.352 7.216,38.648 7.92,38.648 7.92,38.647 7.92,37.943 8.625,37.943 8.625,36.534 7.92,36.534 7.92,37.238 7.217,37.238 7.217,37.239 7.216,37.239 7.216,37.943 6.511,37.943 6.511,37.239 6.51,37.239 6.51,37.238 5.807,37.238 5.807,37.943 3.693,37.943 3.693,37.238 2.99,37.238 2.99,37.239 2.989,37.239 2.989,37.943 2.284,37.943 2.284,37.239 2.283,37.239 2.283,37.238 1.58,37.238 1.58,36.534 0.875,36.534 0.875,37.943 1.58,37.943 1.58,38.647 1.58,38.648 2.284,38.648 2.284,39.352 1.58,39.352 1.58,39.353 1.58,40.057 2.989,40.057 2.989,38.648 3.693,38.648 3.693,40.057 2.989,40.057 2.989,41.466 3,41.466
  region: 0.875,40.564 0.875,40.761 1.579,40.761 1.579,40.76 1.58,40.76 1.58,40.057 0.875,40.057 0.875,40.563
  region: 3.956,36.534 3.693,36.534 3.693,37.238 4.397,37.238 4.398,37.238 4.398,36.534 3.957,36.534
  region: 5.807,37.182 5.807,36.534 5.102,36.534 5.102,37.238 5.103,37.238 5.807,37.238 5.807,37.183
  region: 7.92,40.274 7.92,40.76 7.921,40.76 7.921,40.761 8.625,40.761 8.625,40.057 7.92,40.057 7.92,40.273
  lines w0.25: 19.125,40.75 21.875,40.75 21.875,43.25 19.125,43.25 19.125,40.75
  text "V1" at 19.7,41.4 h1.2
  text "Indication Board" at 11.503,38.9 h1.2
Bottom Overlay:
  lines w0.254: 32,11.758 32.508,11.25 ; 32.508,12.258 32,11.75 39.25,11.75 39.25,19 39.758,18.492 ; 38.75,18.492 39.258,19
  text "Board" at 38.5,14.3 h1.2
  text "Dim" at 38.5,12.5 h1.2
  text "50mm" at 40,12.076 h1.2 r270
  text "42mm" at 37.824,9.05 h1.2
Poly Planning:
  lines w0.1: 2.5,23.75 2.5,25 3.25,25.75 3.5,25.75 33.5,25.75 34.775,27.025 34.775,32.225 33.25,33.75 33.25,36.5 34.25,37.5 36.45,37.5 37.5,36.45 37.5,25.75 34.75,23 33.25,23 3.25,23 2.5,23.75